# Altium PCB updated_pcb_file.PcbDoc (part 1 of 2)
Units mm, origin at the board's own origin, x right, y up, seen from the top; angles counter-clockwise.
Board outline 21 x 53.37 mm, 4 copper layers (Top Layer, Int1 (GND), Int2 (PWR), Bottom Layer), stack 1.334 mm thick; 52 components, 61 nets, 361 pads, 86 vias.
Unrouted connection lines stored in the file: 10.
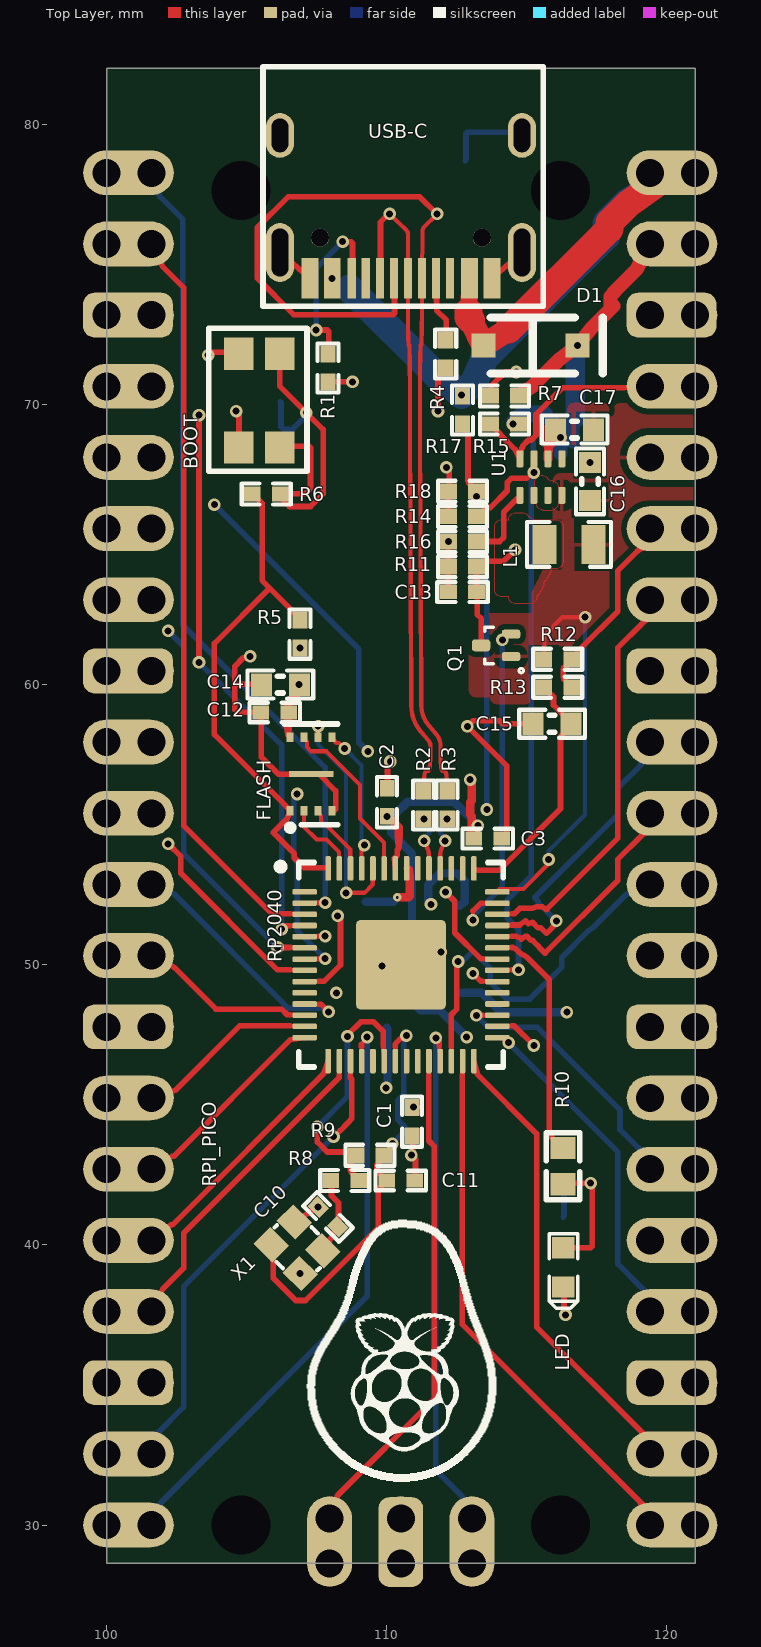
[diagram p0: Top Layer view]
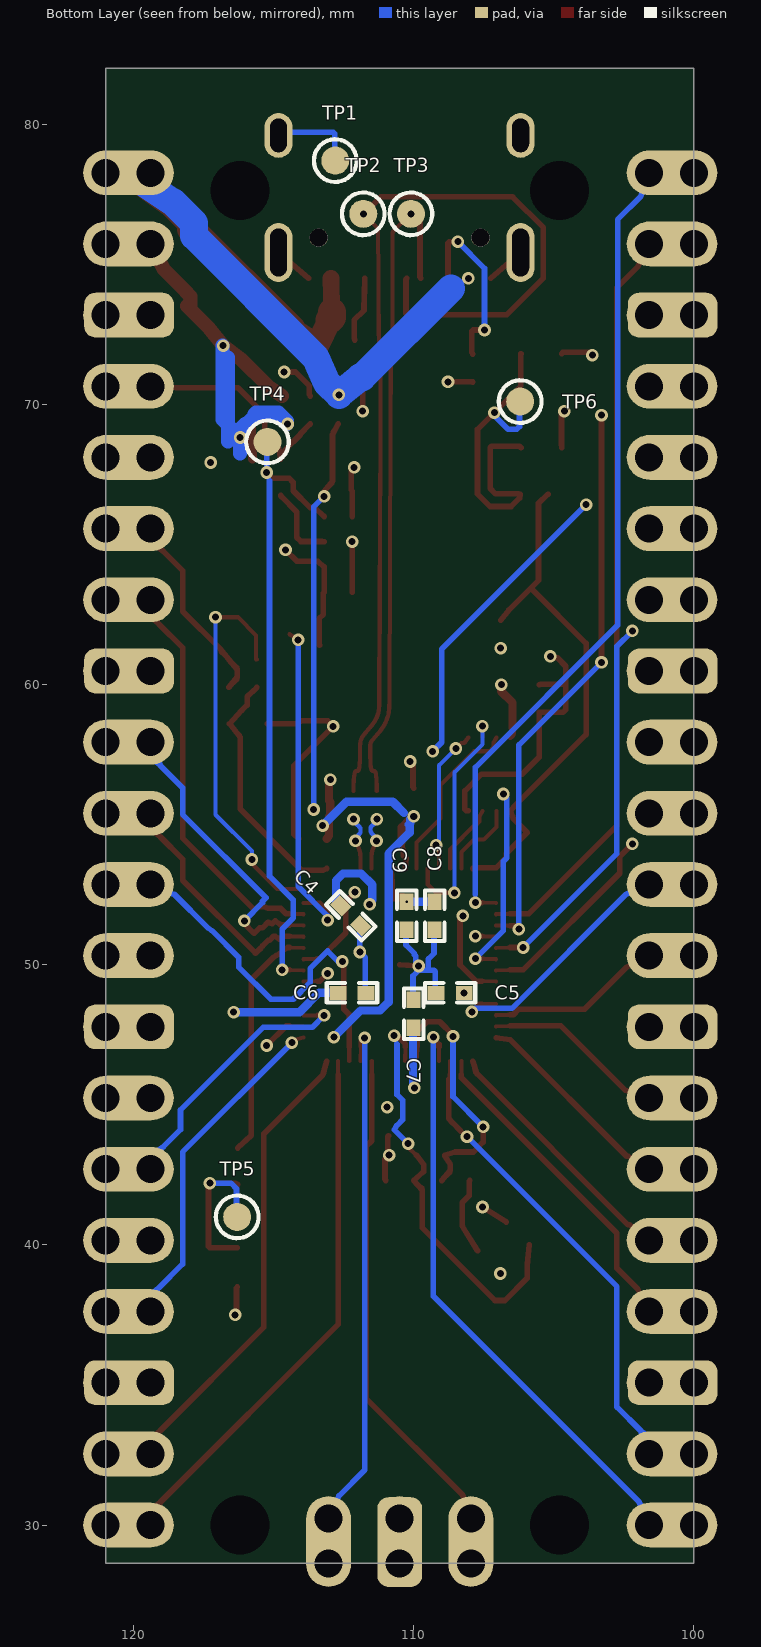
[diagram p1: Bottom Layer view, seen from below]
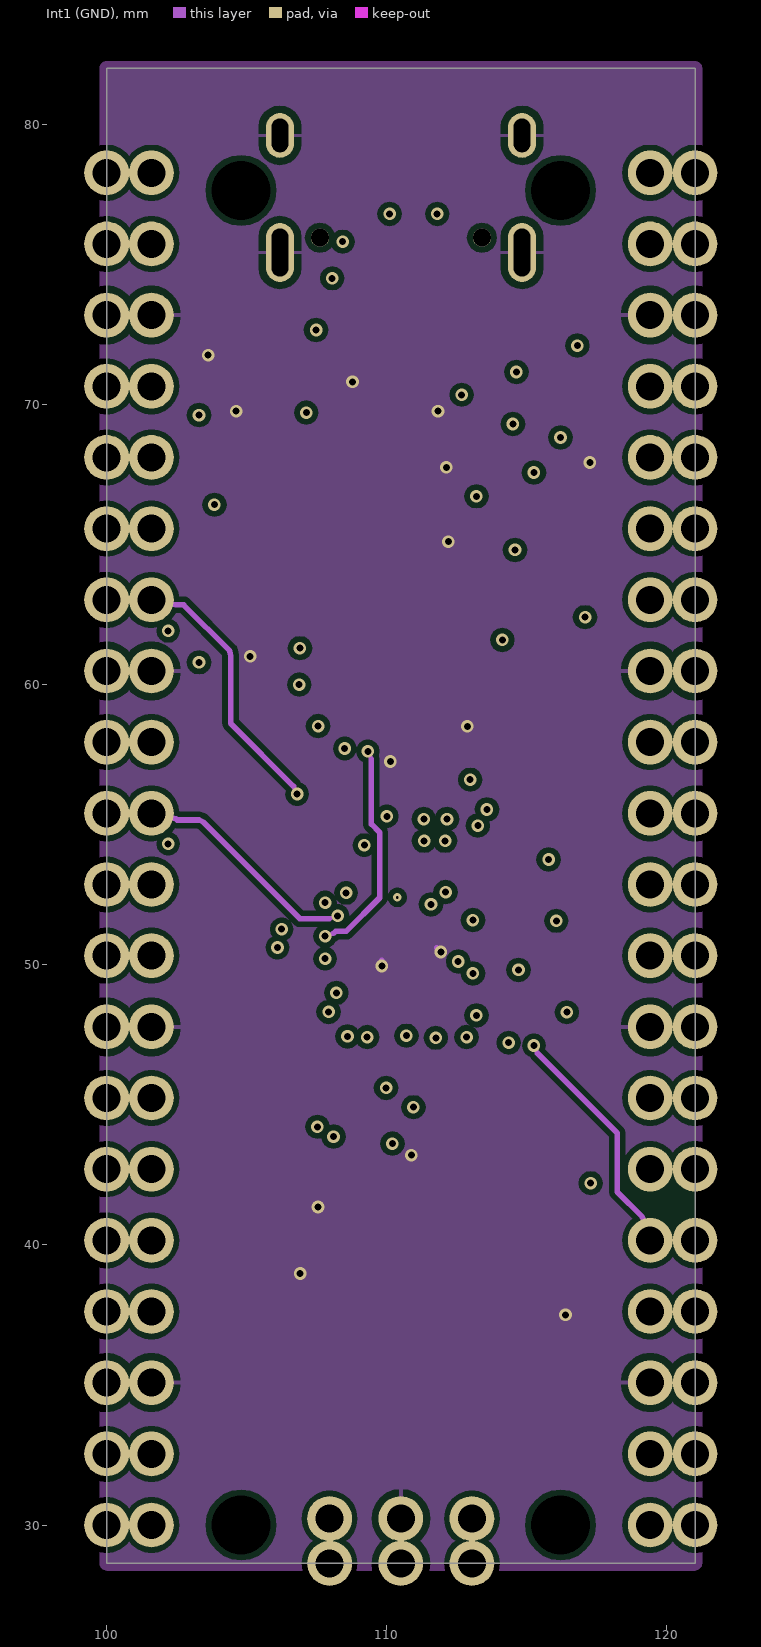
[diagram p2: Int1 (GND)]
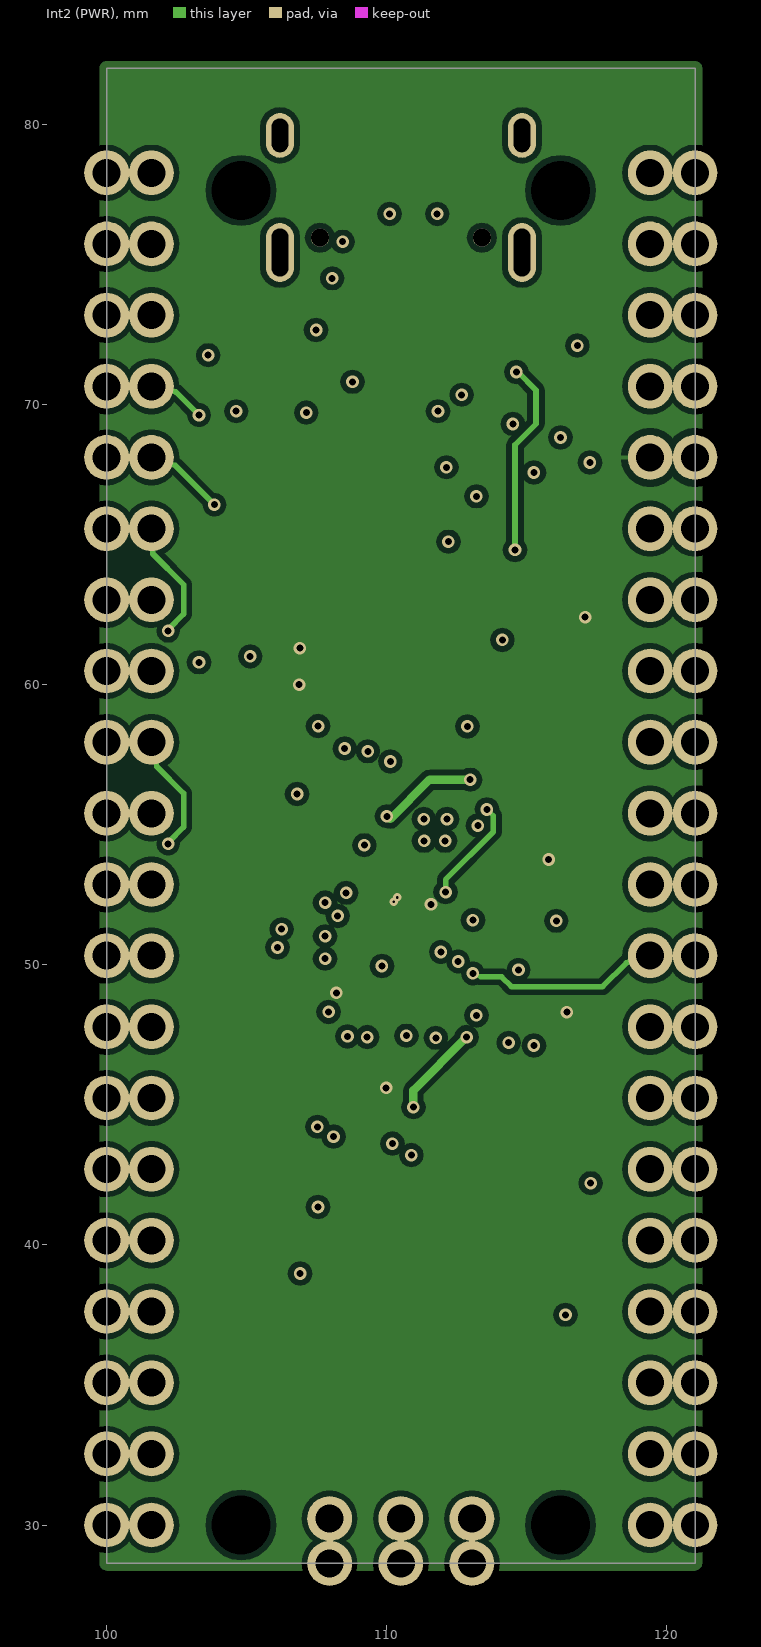
[diagram p3: Int2 (PWR)]
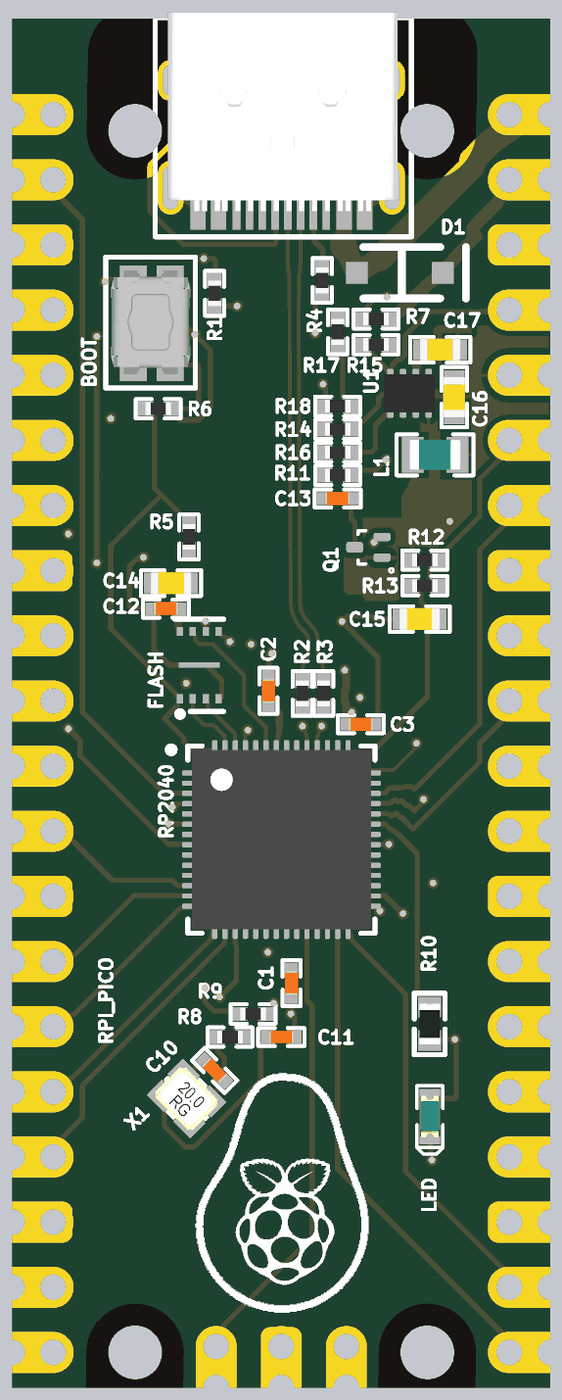
[diagram p5: 3D render of the assembled board from above, using the file's embedded part models]
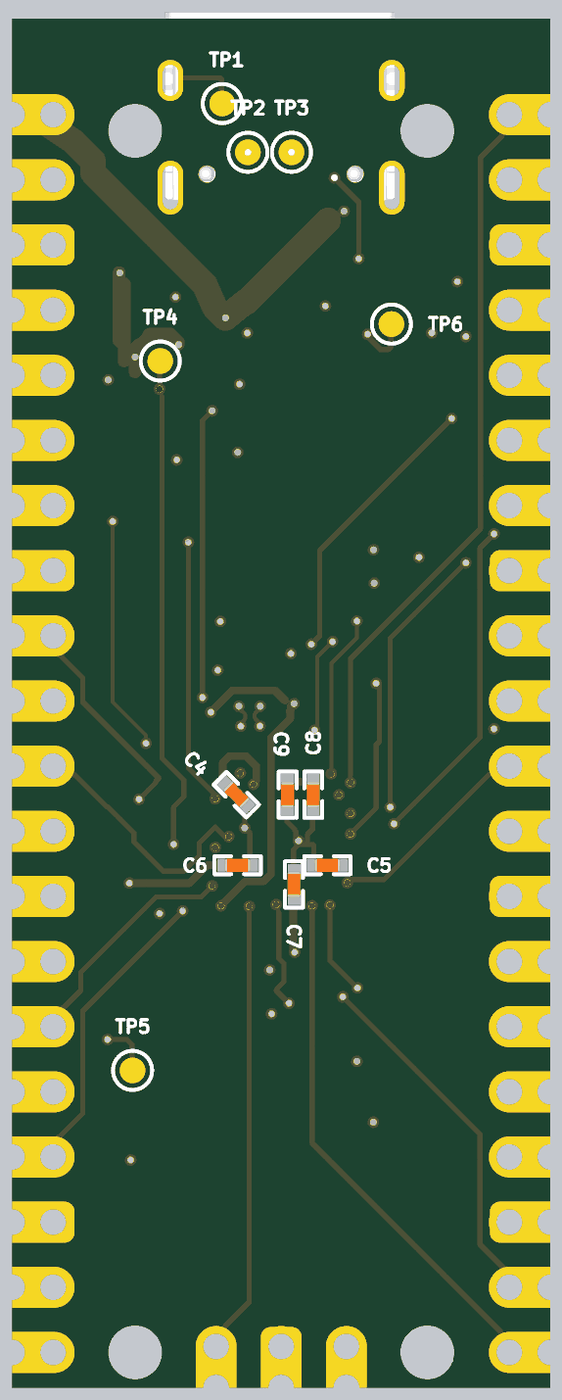
[diagram p6: 3D render of the assembled board from below, using the file's embedded part models]

## Layer stack, top to bottom
Top Solder: solder mask 0.0254, SM-001, Dk 4
Top Layer: signal copper 0.035
Dielectric 1: prepreg 0.1295, PP-017, Dk 4.3
Dielectric 2: prepreg 0.1295, PP-017, Dk 4.3
Int1 (GND): signal copper 0.0175
Dielectric 3: core 0.7112, Core-039, Dk 4.8
Int2 (PWR): signal copper 0.0175
Dielectric 4: prepreg 0.1295, PP-017, Dk 4.3
Dielectric 5: prepreg 0.1295, PP-017, Dk 4.3
Bottom Layer: signal copper 0.035
Bottom Solder: solder mask 0.0254, SM-001, Dk 4

## Board outline
100,28.63 100,82 121,82 121,28.63

## Design rules (kind name [scope] priority, off if disabled: settings)
Clearance Clearance_3 [InComponent('U1')] p1: gap=0.127 ignorepadtopadclearanceinfootprint=TRUE
Clearance Clearance_2 [InNet('VIN')] p2 off: gap=0.8 ignorepadtopadclearanceinfootprint=TRUE
Clearance Clearance_1 [All] p3: gap=0.2 ignorepadtopadclearanceinfootprint=TRUE
Clearance [All] p4 off: gap=0.2 ignorepadtopadclearanceinfootprint=TRUE
ComponentClearance [All] p1 off: gap=0.254 collisioncheckmode=3 verticalgap=0.254 showdistances=FALSE
DiffPairsRouting [InDifferentialPair('DiffPair')] p1: maxlimit=0.254 minlimit=0.089 mostfreqgap=0.2 toplayer_minwidth=0.089 toplayer_maxwidth=0.381 toplayer_prefwidth=0.15 midlayer1_minwidth=0.089 midlayer1_maxwidth=0.381 midlayer1_prefwidth=0.15 midlayer2_minwidth=0.089 midlayer2_maxwidth=0.381 midlayer2_prefwidth=0.15 bottomlayer_minwidth=0.089 bottomlayer_maxwidth=0.381 bottomlayer_prefwidth=0.15 maxuncoupledlength=12.7
HoleSize [All] p1: absolutevalues=TRUE maxlimit=6 minlimit=0.25 maxpercent=80.000 minpercent=20.000
HoleToHoleClearance [All] p1: gap=0.2 allowstackedmicrovias=TRUE
MatchedLengths usb [All] p1 off: tolerance=1 checknetsindiffpair=FALSE checkdiffpairvsdiffpair=TRUE checkxsignals=TRUE checkothers=TRUE
MinimumSolderMaskSliver [All] p1 off: minsoldermaskwidth=0.254
PlaneClearance [All] p1: clearance=0.254
PolygonConnect VIN [InNet('VIN')] p1: connectstyle=Direct reliefconductorwidth=0.254 reliefentries=4 polygonreliefangle="90 Angle" airgapwidth=0.254
PolygonConnect Connectors [HasFootprint('B06B-JWPF-SK-R')] p2: connectstyle=Direct reliefconductorwidth=0.254 reliefentries=4 polygonreliefangle="90 Angle" airgapwidth=0.254
PolygonConnect Connectors_1 [HasFootprint('B08B-JWPF-SK-R')] p3: connectstyle=Direct reliefconductorwidth=0.254 reliefentries=4 polygonreliefangle="90 Angle" airgapwidth=0.254
PolygonConnect Default [All] p4 off: connectstyle=Relief reliefconductorwidth=0.127 reliefentries=2 polygonreliefangle="90 Angle" airgapwidth=0.254
PolygonConnect vbus [InNet('NetQ1_1')] p5: connectstyle=Direct reliefconductorwidth=0.254 reliefentries=4 polygonreliefangle="90 Angle" airgapwidth=0.254
PolygonConnect vbus_1 [InNet('NetC9_1')] p6: connectstyle=Direct reliefconductorwidth=0.254 reliefentries=4 polygonreliefangle="90 Angle" airgapwidth=0.254
PolygonConnect VIAS [IsVia] p7: connectstyle=Direct reliefconductorwidth=0 reliefentries=4 polygonreliefangle="90 Angle" airgapwidth=0
PolygonConnect PolygonConnect_1 [All] p8: connectstyle=Relief reliefconductorwidth=0.127 reliefentries=2 polygonreliefangle="90 Angle" airgapwidth=0.254
RoutingVias [All] p1: holewidth=0.3 width=0.5 viastyle="Through Hole" minholewidth=0.1 minwidth=0.3 maxholewidth=0.25 maxwidth=0.45
SilkToSilkClearance [All] p1 off: silktosilkclearance=0.15
SilkToSolderMaskClearance [IsPad] p1 off: minsilkscreentomaskgap=0.254 clearancetoexposedcopper=TRUE
SolderMaskExpansion SolderMaskExpansion_1 [IsVia] p1: expansion=0.102 istentingtop=TRUE
SolderMaskExpansion [All] p2: expansion=0 istentingtop=FALSE
Width [All] p1: maxlimit=1 minlimit=0.127 preferedwidth=0.2
22 further rules are at their usual default settings.

## Classes and differential pairs
differential pair P: +P_P -P_N

## Components (designator, comment, footprint, x,y, rotation, side; value= is the part's Value field where it differs from the comment)
BOOT "EVP-AA002K" MiniSwitch 106.173,68.454 r90 top
C1 "100nF" C0402 110.901,44.396 r90 top value=100pF
C2 "100nF" C0402 110.001,55.796 r270 top value=100pF
C3 "1uF" C0402 113.601,54.496 r180 top value=100pF
C4 "1uF" C0402 112.251,51.746 r45 bottom value=100pF
C5 "100nF" C0402 108.701,48.996 r180 bottom value=100pF
C6 "100nF" C0402 112.201,48.996 r0 bottom value=100pF
C7 "100nF" C0402 110.001,48.246 r270 bottom value=100pF
C8 "100nF" C0402 109.251,51.746 r90 bottom value=100pF
C9 "100nF" C0402 110.251,51.746 r90 bottom value=100pF
C10 "15pF" C0402 107.901,40.996 r135 top value=100pF
C11 "15pF" C0402 110.501,42.296 r0 top value=100pF
C12 "100nF" C0402 106.001,58.996 r0 top value=100pF
C13 "1nF" C0402 112.701,63.296 r0 top value=100pF
C14 "2.2uF" C0603 106.201,59.996 r0 top value=100pF
C15 "2.2uF" C0603 115.901,58.596 r0 top value=100pF
C16 "10uF" C0603 117.251,67.246 r270 top value=100pF
C17 "4.7uF" C0603 116.701,69.096 r180 top value=100pF
D1 "mbr120vlsft1g" SOD-123 113.454,72.096 r0 top locked
FLASH "GD25Q16CEIGR" GD25Q16CEIGR 106.551,55.49 r90 top
L1 "2.2uH" IND0805 116.501,64.996 r0 top value=120R/0.55A
LED "L0603G" LED_0603 116.301,39.193 r90 top
Q1 "dmg1012T" SOTFL3P40_120X120X55L30X32N 113.899,61.394 r180 top
R1 "5.1K" RES0402 107.901,71.296 r90 top value=0R
R2 "27.4R" RES0402 111.321,55.696 r90 top value=0R
R3 "27.4R" RES0402 112.151,55.696 r90 top value=0R
R4 "5.1K" RES0402 112.101,71.796 r270 top value=0R
R5 "DNP" RES0402 106.901,61.796 r270 top value=0R
R6 "1K" RES0402 105.701,66.796 r180 top value=0R
R7 "200K" RES0402 114.201,70.296 r0 top value=0R
R8 "1K" RES0402 108.501,42.296 r0 top value=0R
R9 "DNP" RES0402 109.401,43.196 r180 top value=0R
R10 "470R" RES0603R 116.291,42.806 r270 top value=0R
R11 "100K" RES0402 112.701,64.196 r0 top value=0R
R12 "200R" RES0402 116.101,60.896 r180 top value=0R
R13 "1R" RES0402 116.101,59.896 r180 top value=0R
R14 "100K" RES0402 112.701,65.996 r180 top value=0R
R15 "100K" RES0402 114.201,69.296 r0 top value=0R
R16 "267K" RES0402 112.701,65.096 r0 top value=0R
R17 "5.1K" RES0402 112.701,69.796 r90 top value=0R
R18 "5.1K" RES0402 112.701,66.896 r0 top value=0R
RP2040 "RP2040" RP2040 110.506,49.996 r0 top locked
RPI_PICO "DNP" "RPI PICO" 100,30.001 r0 top locked
TP1 "DNP" TP_SMD_1.0mm 112.801,78.696 r180 bottom
TP2 "DNP" TP_SMD_1.0mm 111.801,76.796 r90 bottom
TP3 "DNP" TP_SMD_1.0mm 110.101,76.796 r90 bottom
TP4 "DNP" TP_SMD_1.0mm 115.221,68.656 r0 bottom
TP5 "DNP" TP_SMD_1.0mm 116.301,40.996 r90 bottom
TP6 "DNP" TP_SMD_1.0mm 106.201,70.096 r90 bottom
U1 "TPS62840DLCR" TPS62840 115.501,67.398 r270 top
USB-C "TYPE-C-31-M-12" TYPE-C-31-M-12 113.756,74.501 r180 top locked
X1 "12MHz" XTAL_2016 106.801,39.896 r315 top value=32MHz

## Footprints (in the part's own frame and the unit in brackets; to place one, negate y for a bottom-side part, rotate by r counter-clockwise, add the part's x,y. Pads: shape width x height; smd on the part's side, far side on the other; paste and mask are expansions set on the pad)
C0402 [mm]
  rect 0.6x0.5 smd: 1(-0.5,0) 2(0.5,0)
  silkscreen extent -0.9,-0.35 0.9,0.35, body extent -0.51,-0.25 0.51,0.25, height 0.5
C0603 [mm]
  rect 0.75x0.8 smd: 1(-0.675,0) 2(0.675,0)
  silkscreen extent -1.17,-0.5 1.17,0.5, body extent -0.8,-0.44 0.8,0.43, height 0.8
GD25Q16CEIGR [mm] "Flash SPI USON8 Package"
  rect 0.35x0.25 smd: 1(0,0) 2(0,-0.5) 3(0,-1) 4(0,-1.5) 5(2.625,-1.5) 6(2.625,-1) 7(2.625,-0.5) 8(2.625,0)
  rect 0.2x1.6 smd: 4(1.312,-0.75)
  silkscreen extent -0.7,-1.7 3.1,0.2, body extent -0.18,-1.74 2.82,0.26, height 0.45
IND0805 [mm] "Inductor 0805 reflow soldering"
  rect 0.85x1.4 smd: 1(-0.875,0) 2(0.875,0)
  silkscreen extent -1.5,-0.8 1.5,0.8, body extent -1,-0.59 1,0.6, height 0.99
LED_0603 [mil]
  rect 30x32 smd: 1(-27.5,0) 2(27.5,0)
  silkscreen extent -58,-20 48,20, body extent -32,-16 32,16, height 24
MiniSwitch [mm]
  rect 1.15x1.05 smd: 1(0,1.45) 1(3.35,1.45) 2(0,0) 2(3.35,0)
  silkscreen extent -0.85,-0.98 4.25,2.52, body extent -0.43,-0.78 3.87,2.33, height 1.7
RES0402 [mm]
  rect 0.6x0.55 smd: 1(-0.5,0) 2(0.5,0)
  silkscreen extent -0.87,-0.38 0.88,0.38, body extent -0.5,-0.25 0.5,0.25, height 0.3
RES0603R [mm] "resistor 0603 reflow soldering"
  rect 0.8x0.9 smd: 1(-0.65,0) 2(0.65,0)
  silkscreen extent -1.2,-0.6 1.2,0.6, body extent -0.8,-0.4 0.8,0.4, height 0.45
RP2040 [mm]
  rrect50% 0.875x0.2 smd: 1(-3.437,2.6) 2(-3.437,2.2) 3(-3.437,1.8) 4(-3.437,1.4) 5(-3.437,1) 6(-3.437,0.6) 7(-3.437,0.2) 8(-3.437,-0.2) 9(-3.437,-0.6) 10(-3.437,-1) 11(-3.437,-1.4) 12(-3.437,-1.8) 13(-3.437,-2.2) 14(-3.437,-2.6) 29(3.437,-2.6) 30(3.437,-2.2) 31(3.437,-1.8) 32(3.437,-1.4) 33(3.437,-1) 34(3.437,-0.6) 35(3.437,-0.2) 36(3.437,0.2) 37(3.437,0.6) 38(3.437,1) 39(3.437,1.4) 40(3.437,1.8) 41(3.437,2.2) 42(3.437,2.6)
  rrect50% 0.2x0.875 smd: 15(-2.6,-3.437) 16(-2.2,-3.437) 17(-1.8,-3.437) 18(-1.4,-3.437) 19(-1,-3.437) 20(-0.6,-3.437) 21(-0.2,-3.437) 22(0.2,-3.437) 23(0.6,-3.437) 24(1,-3.437) 25(1.4,-3.437) 26(1.8,-3.437) 27(2.2,-3.437) 28(2.6,-3.437) 43(2.6,3.437) 44(2.2,3.437) 45(1.8,3.437) 46(1.4,3.437) 47(1,3.437) 48(0.6,3.437) 49(0.2,3.437) 50(-0.2,3.437) 51(-0.6,3.437) 52(-1,3.437) 53(-1.4,3.437) 54(-1.8,3.437) 55(-2.2,3.437) 56(-2.6,3.437)
  rrect10% 3.2x3.2 smd: 57(0,0)
  silkscreen extent -4.42,-3.65 3.65,3.65, body extent -3.5,-3.5 3.5,3.5, height 0.9
"RPI PICO" [mm] "PICO"
  round 1.6 hole 1: 1(0,48.26) 1(1.6,48.26) 2(0,45.72) 2(1.6,45.72) 3(0,43.18) 3(1.6,43.18) 4(0,40.64) 4(1.6,40.64) 5(0,38.1) 5(1.6,38.1) 6(0,35.56) 6(1.6,35.56) 7(0,33.02) 7(1.6,33.02) 8(0,30.48) 8(1.6,30.48) 9(0,27.94) 9(1.6,27.94) 10(0,25.4) 10(1.6,25.4) 11(0,22.86) 11(1.6,22.86) 12(0,20.32) 12(1.6,20.32) 13(0,17.78) 13(1.6,17.78) 14(0,15.24) 14(1.6,15.24) 15(0,12.7) 15(1.6,12.7) 16(0,10.16) 16(1.6,10.16) 17(0,7.62) 17(1.6,7.62) 18(0,5.08) 18(1.6,5.08) 19(0,2.54) 19(1.6,2.54) 20(0,0) 20(1.6,0) 21(19.4,0) 21(21,0) 22(19.4,2.54) 22(21,2.54) 23(19.4,5.08) 23(21,5.08) 24(19.4,7.62) 24(21,7.62) 25(19.4,10.16) 25(21,10.16) 26(19.4,12.7) 26(21,12.7) 27(19.4,15.24) 27(21,15.24) 28(19.4,17.78) 28(21,17.78) 29(19.4,20.32) 29(21,20.32) 30(19.4,22.86) 30(21,22.86) 31(19.4,25.4) 31(21,25.4) 32(19.4,27.94) 32(21,27.94) 33(19.4,30.48) 33(21,30.48) 34(19.4,33.02) 34(21,33.02) 35(19.4,35.56) 35(21,35.56) 36(19.4,38.1) 36(21,38.1) 37(19.4,40.64) 37(21,40.64) 38(19.4,43.18) 38(21,43.18) 39(19.4,45.72) 39(21,45.72) 40(19.4,48.26) 40(21,48.26) 41(7.96,-1.37) 41(7.96,0.23) 42(10.5,-1.37) 42(10.5,0.23) 43(13.04,-1.37) 43(13.04,0.23)
  oval 3.2x1.6 smd paste-1: 1(0.762,48.26) 2(0.762,45.72) 4(0.762,40.64) 5(0.762,38.1) 6(0.762,35.56) 7(0.762,33.02) 9(0.762,27.94) 10(0.762,25.4) 11(0.762,22.86) 12(0.762,20.32) 14(0.762,15.24) 15(0.762,12.7) 16(0.762,10.16) 17(0.762,7.62) 19(0.762,2.54) 20(0.762,0) 21(20.162,0) 22(20.162,2.54) 24(20.162,7.62) 25(20.162,10.16) 26(20.162,12.7) 27(20.162,15.24) 29(20.162,20.32) 30(20.162,22.86) 31(20.162,25.4) 32(20.162,27.94) 34(20.162,33.02) 35(20.162,35.56) 36(20.162,38.1) 37(20.162,40.64) 39(20.162,45.72) 40(20.162,48.26)
  oval 3.2x1.6 smd far side paste-1: 1(0.762,48.26) 2(0.762,45.72) 4(0.762,40.64) 5(0.762,38.1) 6(0.762,35.56) 7(0.762,33.02) 9(0.762,27.94) 10(0.762,25.4) 11(0.762,22.86) 12(0.762,20.32) 14(0.762,15.24) 15(0.762,12.7) 16(0.762,10.16) 17(0.762,7.62) 19(0.762,2.54) 20(0.762,0) 21(20.162,0) 22(20.162,2.54) 24(20.162,7.62) 25(20.162,10.16) 26(20.162,12.7) 27(20.162,15.24) 29(20.162,20.32) 30(20.162,22.86) 31(20.162,25.4) 32(20.162,27.94) 34(20.162,33.02) 35(20.162,35.56) 36(20.162,38.1) 37(20.162,40.64) 39(20.162,45.72) 40(20.162,48.26)
  rrect50% 3.2x1.6 smd paste-1: 3(0.762,43.18) 8(0.762,30.48) 13(0.762,17.78) 18(0.762,5.08) 23(20.162,5.08) 28(20.162,17.78) 33(20.162,30.48) 38(20.162,43.18)
  rrect50% 3.2x1.6 smd far side paste-1: 3(0.762,43.18) 8(0.762,30.48) 13(0.762,17.78) 18(0.762,5.08) 23(20.162,5.08) 28(20.162,17.78) 33(20.162,30.48) 38(20.162,43.18)
  oval 1.6x3.2 smd paste-1: 41(7.96,-0.608) 43(13.04,-0.608)
  oval 1.6x3.2 smd far side paste-1: 41(7.96,-0.608) 43(13.04,-0.608)
  rrect50% 1.6x3.2 smd paste-1: 42(10.5,-0.608)
  rrect50% 1.6x3.2 smd far side paste-1: 42(10.5,-0.608)
  round 1 hole 2.1 unplated: 44(4.8,0) 44(4.8,47.63) 44(16.2,0) 44(16.2,47.63)
SOD-123 [mm] "Diode"
  rect 0.85x0.85 smd: 1(0,0) 2(3.35,0)
  silkscreen extent 0.25,-1 4.25,1, body extent 0.25,-0.75 3.25,0.75, height 1.35
SOTFL3P40_120X120X55L30X32N [mm]
  rrect54% 0.66x0.32 smd: 1(-0.535,0.4) 2(-0.535,-0.4)
  rrect54% 0.66x0.42 smd: 3(0.535,0)
  silkscreen extent -0.98,-0.65 0.4,0.98, body extent -0.5,-0.7 0.4,0.6, height 0.6
TP_SMD_1.0mm [mm]
  round 1 smd paste-5: 1(0,0)
  silkscreen extent -0.76,-0.76 0.76,0.76
TPS62840 [mm]
  rrect40% 0.6x0.25 smd: 1(-0.65,0.75) 2(-0.65,0.25) 3(-0.65,-0.25) 4(-0.65,-0.75) 5(0.65,-0.75) 6(0.65,-0.25) 7(0.65,0.25) 8(0.65,0.75)
  body extent -0.75,-1 0.75,1, height 1
TYPE-C-31-M-12 [mm]
  rect 0.6x1.45 smd: 1(0,0) 1(6.5,0) 2(0.8,0) 2(5.7,0)
  rect 0.3x1.45 smd: 3(1.5,0) 4(2,0) 5(2.5,0) 6(3,0) 7(3.5,0) 8(4,0) 9(4.5,0) 10(5,0)
  oval 1x2.1 hole 1.7 slot 0.6 at 0 deg: 11(-1.07,-0.915) 11(7.57,-0.915)
  oval 1x1.6 hole 1.2 slot 0.6 at 0 deg: 11(-1.07,-5.095) 11(7.57,-5.095)
  round 0.65 hole 0.65: 12(0.36,-1.445) 12(6.14,-1.445)
  silkscreen extent -1.83,-7.55 8.18,1, body extent -1.27,-7.75 7.68,0, height 3.27
XTAL_2016 [mm]
  rect 0.95x0.85 smd: 1(-0.725,-0.575) 2(0.725,-0.575) 3(0.725,0.575) 4(-0.725,0.575)
  silkscreen extent -1.08,-0.88 1.08,0.88, body extent -1.05,-0.85 1.05,0.85, height 0.56

## Part data
BOOT: library part SwitchMini, "EVPAA002K = 1.0 N, EVPAAU02Q = 7.0 N", Supplier Part Number 1=P13347SCT-ND, Supplier 1=Digi-Key
C1 C2 C3 C4 C5 C6 C7 C8 C9 C10 C11 C12 C13 C14 C15 C16 C17: library part CAP, "Capacitor", Published=8-Jun-2000, Publisher="Altium Limited", Revision="July-2002: Re-released for DXP Platform."
D1: library part Diode, "Switch-mode Schottky / Power Rectifier / 250 V, 40 A"
FLASH: library part "Flash SPI", "Flash SPI 16Mb = 2 MB", Supplier Part Number 1=363-GD25Q16CEIGR, Supplier 1=Mouser
L1: "Inductor", Manufacturer=Murata, Manufacturer Part Number=BLM15AG121SN1D, Part Number=FB0402-120R@100M-500mA, Part number IPS=N.A., Artikkelnr Noca=33029317, ComponentLink1Description=Datasheet, ComponentLink2Description="Supplier link", Footprint Doc=0402, HelpURL=http://search.murata.co.jp/Ceramy/image/img/PDF/ENG/L0110S0100BLM15A_SN.pdf, LatestRevisionDate=2014-01-10, Note="Chip EMIFIL Inductor Type Chip Ferrite Bead", Pin Count=2, Published=2011-11-14, Publisher="Nordic Semiconductor"
LED: "LED, Green, 0603, 570nm, Vf=1.7V, 2.24..5.6mcd, - 40 to +100Â°C", Manufacturer=Osram, Manufacturer Part Number="LG L29K-G2J1-24-Z", Part Number="LG L29K Smartled Green", Part number IPS=N.A., Supplier Part Number 1=475-2709-1-ND, Artikkelnr Noca=13019147, ComponentLink1Description=Datasheet, ComponentLink2Description="Supplier link", Footprint Doc=0603, HelpURL=http://www.osram-os.com/Graphics/XPic2/00077107_0.pdf, LatestRevisionDate=2017-08-21, Note="2.24..5.6 mcd, Vfmin=1.7V", Pin Count=2, Published=2014-10-28, Publisher="Nordic Semiconductor", Supplier 1=Digi-Key, Supplier 2=Mouser, Supplier Part Number 2=720-LGL29KG2J124Z
Q1: library part Transistor, "N-Channel 20V 100mA _Ta_ 150mW _Ta_ Surface Mount VMT3", Package="SOT-723 Rohm", Digi-Key_Part_Number=RUM001L02T2CLCT-ND, Digi-Key_Purchase_URL=https://www.digikey.com/product-detail/en/rohm-semiconductor/RUM001L02T2CL/RUM001L02T2CLCT-ND/4571412?utm_source=snapeda&utm_medium=aggregator&utm_campaign=symbol, MF=Rohm, MP=RUM001L02T2CL, SnapEDA_Link=https://www.snapeda.com/parts/RUM001L02T2CL/Rohm/view-part/531428/?ref=snap
R1 R2 R3 R4 R5 R6 R7 R8 R9 R10 R11 R12 R13 R14 R15 R16 R17 R18: "Resistor, Â±5%, 0.05W", Part Number=R0201-0R, Part number IPS=00000003245, Artikkelnr Noca=N.A., ComponentLink1Description=Datasheet, ComponentLink2Description="Supplier link", Footprint Doc=0201, LatestRevisionDate=2017-11-09, Note="Chip Res 5%", Pin Count=2, Published=2014-11-13, Publisher="Nordic Semiconductor"
RP2040: "RP2040 First MCU from RPI"
RPI_PICO: library part RPI_PICO, "RPI_PICO"
TP1 TP2 TP3 TP4 TP5 TP6: library part TP
U1: library part TPS62840, "Ultra low IQ Step Down Converter, DLC0008A (VSON-HR-8)", Alternate Manufacturer="Texas Instruments", Operating Temperature Range="-40 to 125 C", Supplier Part Number 1=595-TPS62840DLCR, AEC Category=Q200, AEC Qualified=N, ComponentLink1Description="Datasheet Link", ComponentLink1URL=http://www.ti.com/lit/ds/symlink/tps62840.pdf, ComponentLink2Description="Product Folder", ComponentLink2URL=http://www.ti.com/product/tps62840, ComponentLink3Description="Online Datasheet", ComponentLink3URL=http://www.ti.com/product/tps62840/datasheet, CompType=IC, Manufacturer="Texas Instruments", MountType=SMT, PackageDescription=VSON-HR-8, PackageReference=DLC0008A, PartNumber=TPS62840DLCR, SizeArea_mm2=3, SizeAreaWB_mm2=7.5, SizeX_mm=1.5, SizeY_mm=2, SizeZ_mm=1, Supplier 1=Mouser
USB-C: library part USB-C, "USB C connector", ComponentLink1Description=LCSC, ComponentLink1URL=https://lcsc.com/product-detail/USB-Connectors_Korean-Hroparts-Elec-TYPE-C-31-M-12_C165948.html
X1: "XTAL SMD 2016, 32MHz, Cl=8pF, Total Tol: Â±40ppm", Part Number=XTAL_SMD2016_32MHz_8pF_General, Footprint Doc=XTAL_2016, LatestRevisionDate=2016-08-19, Pin Count=4, Published=2016-08-19, Publisher="Nordic Semiconductor"

## Via types
v1: diameter 0.45, hole 0.25, Top Layer to Bottom Layer, tented both sides, 84 vias
v2: diameter 0.3, hole 0.1, Int2 (PWR) to Bottom Layer, tented both sides, 1 vias
v3: diameter 0.3, hole 0.1, Top Layer to Int2 (PWR), tented both sides, 1 vias

## Nets (pads, with @x,y where several pads share a name; then routed paths per layer and width w, separated by ;. In a path a pad name is that pad's centre, name@x,y a point inside that pad or via, vN(x,y) a via of type N, cw(c..) or ccw(c..) an arc to the next point about the centre after c; other vN are vias at no path point)
1V1: C1.2 C2.2 C3.2 RP2040.23 RP2040.45 RP2040.50 | length 23.7
  Top Layer w0.2: RP2040.50@110.305,53.432 110.276,53.801 110.376,53.901 110.376,54.101 110.426,54.151
  Top Layer w0.212: 110.426,54.151 110.426,54.201
  Top Layer w0.222: 110.426,54.201 110.426,54.251
  Top Layer w0.232: 110.426,54.251 110.426,54.301
  Top Layer w0.242: 110.426,54.301 110.426,54.351
  Top Layer w0.252: 110.426,54.351 110.426,54.401
  Top Layer w0.262: 110.426,54.401 110.426,54.451
  Top Layer w0.272: 110.426,54.451 110.426,54.501
  Top Layer w0.282: 110.426,54.501 110.426,54.551
  Top Layer w0.292: 110.426,54.551 110.426,54.601
  Top Layer w0.3: v1(110,55.295) 110.126,55.201 110.426,54.901 110.426,54.601 ; v1(112.976,56.601) 113.026,56.551 113.026,55.851 112.976,55.801 112.976,55.351 113.026,55.301 113.026,54.601 C3.2@113.101,54.496
  Int2 (PWR) w0.3: v1@110.126,55.201 111.526,56.601 v1(112.976,56.601) ; v1(110.949,44.914) 110.949,45.514 v1(112.849,47.414)
  Bottom Layer w0.3: v1@110.126,55.201 110.126,55.051 110.176,55.001 ; 110.149,54.964 110.149,54.714 110.899,53.964 110.899,48.664 111.199,48.364 111.899,48.364 v1(112.849,47.414) ; 110.349,55.414 110.749,55.814 112.399,55.814 v1(113.249,54.964)
3V3: C4.2 C5.2 C6.2 C7.2 C8.2 C9.2 C12.2 C14.2 C16.2 FLASH.8 L1.2 Q1.1 R5.2 R12.2 RP2040.1 RP2040.10 RP2040.22 RP2040.33 RP2040.42 RP2040.44 RP2040.48 RP2040.49 RPI_PICO.36 U1.8 | length 28.3
  Top Layer w0.15: RP2040.42@113.942,52.595 113.976,52.651 114.026,52.701 114.876,52.701 115.776,53.601 v1(115.776,53.751) ; R12.2@115.6,60.895 115.626,60.901 115.626,61.751 116.276,62.401 v1(117.076,62.401)
  Top Layer w0.2: FLASH.8@106.526,58.151 FLASH.8@106.55,58.113 ; RP2040.49@110.705,53.432 RP2040.49@110.776,53.451
  Top Layer w0.212: FLASH.8@106.476,58.201 FLASH.8@106.526,58.151 ; RP2040.49@110.776,53.451 110.826,53.401
  Top Layer w0.224: FLASH.8@106.476,58.201 FLASH.8@106.476,58.251 ; 110.826,53.351 110.826,53.401
  Top Layer w0.234: FLASH.8@106.476,58.251 106.476,58.301 ; 110.826,53.301 110.826,53.351
  Top Layer w0.244: 106.476,58.301 106.476,58.351 ; 110.826,53.251 110.826,53.301
  Top Layer w0.254: 106.476,58.351 106.476,58.401 ; 110.826,53.201 110.826,53.251
  Top Layer w0.264: 106.476,58.401 106.476,58.451 ; 110.826,53.151 110.826,53.201
  Top Layer w0.274: 106.476,58.451 106.476,58.501 ; 110.826,53.101 110.826,53.151
  Top Layer w0.284: 106.476,58.501 106.476,58.551 ; 110.826,53.051 110.826,53.101
  Top Layer w0.294: 106.476,58.551 106.476,58.601 ; 110.826,53.001 110.826,53.051
  Top Layer w0.3: 106.476,58.601 106.476,59.351 106.876,59.751 v1(106.875,59.995) ; v3(110.376,52.401) 110.776,52.401 110.826,52.451 110.826,53.001
  Bottom Layer w0.15: v1(115.776,53.751) 115.776,54.051 117.076,55.351 v1(117.076,62.401)
  Bottom Layer w0.3: C8.2@109.251,52.246 v2(110.25,52.245) ; v1(109.976,45.601) 110.026,45.651 110.026,47.701 C7.2@110,47.745 ; v1(111.576,52.151) 111.576,52.201 111.476,52.301 111.476,52.851 111.876,53.251 112.526,53.251 112.776,53.001 112.776,52.251 C4.2@112.604,52.099 ; C6.2@112.7,48.995 112.776,49.001 113.376,49.001 114.076,48.301 v1(116.426,48.301)
  other v1: 108.2,48.995 106.9,61.295
A0: RP2040.38 RPI_PICO.31 | length 11.7
  Top Layer w0.15: 119.049,54.564 119.084,54.648 ; RPI_PICO.31@119.4,55.395 119.084,54.648 ; RPI_PICO.31@120.162,55.395 119.084,54.648 ; RP2040.38@113.938,50.995 114.375,51.014 114.449,51.014 RP2040.38@113.938,50.995
  Top Layer w0.2: 114.449,51.014 114.599,51.014 114.749,50.964 114.799,50.914 114.949,51.014 114.999,51.014 115.149,50.864 115.199,50.864 115.399,50.664 115.462,50.586 115.571,50.477 115.649,50.414 118.249,53.014 118.249,53.764 119.049,54.564 RPI_PICO.31@120.162,55.395
A1: RP2040.39 RPI_PICO.32 | length 15.1
  Top Layer w0.15: v1@116.049,51.464 v1(116.049,51.564) ; RP2040.39@113.938,51.395 114.449,51.414 114.375,51.414 RP2040.39@113.938,51.395
  Top Layer w0.2: 114.449,51.414 114.749,51.414 114.799,51.464 114.949,51.564 115.049,51.464 115.199,51.514 115.399,51.314 115.499,51.314 115.699,51.114 v1@116.049,51.464
  Bottom Layer w0.15: 119.049,57.114 119.081,57.19 ; RPI_PICO.32@119.4,57.935 119.081,57.19 ; RPI_PICO.32@120.162,57.935 119.081,57.19
  Bottom Layer w0.2: v1(116.049,51.564) 115.399,52.214 115.399,52.264 115.274,52.389 118.249,55.364 118.249,56.314 119.049,57.114 ; RPI_PICO.32@119.4,57.935 119.049,57.114 ; RPI_PICO.32@120.162,57.935 119.049,57.114
A2: RP2040.40 RPI_PICO.34 | length 17.6
  Top Layer w0.15: 119.099,62.164 119.13,62.249 ; RPI_PICO.34@119.4,63.015 119.13,62.249 ; RPI_PICO.34@120.162,63.015 119.13,62.249 ; RP2040.40@113.938,51.795 114.449,51.814 114.375,51.814 RP2040.40@113.938,51.795
  Top Layer w0.2: 114.449,51.814 114.549,51.814 114.749,52.014 115.199,52.014 115.349,52.064 115.549,52.064 115.699,51.964 118.249,54.514 118.249,61.314 119.099,62.164 RPI_PICO.34@120.162,63.015
A3: Q1.2 RP2040.41 | length 13
  Top Layer w0.15: v1(113.074,51.589) 113.074,51.914 ; 113.424,52.189 113.938,52.195 113.5,52.189 113.424,52.189 ; v1(114.124,61.589) 114.435,61.795 114.158,61.642 v1(114.124,61.589)
  Top Layer w0.2: 113.074,51.914 113.349,52.189 113.424,52.189
  Bottom Layer w0.15: v1(113.074,51.589) v1@113.074,51.739
  Bottom Layer w0.2: v1@113.074,51.739 114.124,52.789 v1(114.124,61.589)
ENABLE: R15.1 RPI_PICO.37 U1.4 | length 12.6
  Top Layer w0.15: R15.1@113.7,69.295 114,69.02 114.049,68.939 ; 114.574,68.389 114.64,68.33 114.75,68.045 114.824,68.345 114.824,68.439 ; 118.474,70.589 RPI_PICO.37@118.566,70.589 ; RPI_PICO.37@119.4,70.635 RPI_PICO.37@118.566,70.589 ; RPI_PICO.37@120.162,70.635 RPI_PICO.37@118.566,70.589
  Top Layer w0.2: R15.1@113.7,69.295 114.049,68.939 114.049,68.914 114.574,68.389 114.75,68.045 114.824,68.439 114.849,68.464 114.849,68.514 115.049,68.714 115.149,68.714 115.324,68.889 115.324,69.639 116.274,70.589 118.474,70.589 RPI_PICO.37@120.162,70.635
GND: BOOT.1 C1.1 C2.1 C3.1 C4.1 C5.1 C6.1 C7.1 C8.1 C9.1 C10.2 C11.2 C12.1 C13.1 C14.1 C15.1 C16.1 C17.1 FLASH.4 LED.1 R1.1 R4.2 R11.1 R14.2 R16.1 R18.1 RP2040.19 RP2040.57 RPI_PICO.3 RPI_PICO.8 RPI_PICO.13 RPI_PICO.18 RPI_PICO.23 RPI_PICO.28 RPI_PICO.33 RPI_PICO.38 RPI_PICO.42 TP1.1 U1.1 USB-C.1 USB-C.11 X1.2 X1.4 | length 45.4
  Top Layer w0.2: v1(103.626,71.751) 103.626,71.801 103.676,71.851 104.676,71.851 BOOT.1@104.722,71.802 ; v1(104.626,69.751) 104.726,69.651 104.726,68.551 BOOT.1@104.722,68.452 ; v1(105.126,61.001) 105.076,60.951 104.876,60.951 104.576,60.651 104.576,60.001 ; C14.1@105.525,59.995 105.476,60.001 104.576,60.001 ; USB-C.11@106.185,75.415 USB-C.1@107.255,74.5 ; X1.4@106.694,40.814 v1(107.546,41.349) ; R1.1@107.9,70.795 107.976,70.801 v1(108.776,70.801) ; FLASH.4@108.05,55.488 108.126,55.501 108.176,55.551 108.176,56.201 107.576,56.801 107.3,56.801 106.126,56.801 105.526,57.401 105.526,59.001 105.5,58.995 105.476,59.001 104.676,59.001 104.576,59.101 104.576,60.001 ; v1(109.826,49.951) RP2040.57@110.505,49.995 ; C2.1@110,56.295 110.026,56.351 110.026,57.151 v1(110.126,57.251) ; C1.1@110.9,43.895 110.926,43.851 110.926,43.251 v1(110.876,43.201) 111.026,43.051 111.026,42.351 C11.2@111.001,42.296 ; v1(111.826,69.751) 111.826,71.001 R4.2@112.101,71.296 ; v1(112.126,67.751) 112.226,67.651 112.226,66.951 112.2,66.895 R14.2@112.2,65.995 ; v1(112.2,65.095) 112.2,64.195 C13.1@112.2,63.295 ; USB-C.1@113.755,74.5 USB-C.11@114.826,75.416 ; C3.1@114.1,54.495 114.276,54.651 114.276,57.101 v1(112.876,58.501) 113.076,58.701 114.026,58.701 114.126,58.601 C15.1@115.225,58.595 ; LED.1@116.3,38.493 116.326,38.451 116.326,37.551 v1(116.376,37.501)
  Int1 (GND) w0.2: v1(109.826,49.951) v1@109.826,50.151 ; v1@111.776,50.601 v1(111.926,50.451)
  Bottom Layer w0.2: C5.1@109.2,48.995 109.226,49.051 109.226,49.751 109.276,49.801 109.476,49.801 ; C8.1@109.25,51.245 109.276,51.201 109.276,50.401 109.476,50.201 109.476,49.801 ; C7.1@110.001,48.746 110.026,48.801 110.026,49.601 v1@109.826,49.801 ; C9.1@110.25,51.245 110.276,51.201 110.276,50.701 109.976,50.401 109.976,50.351 109.926,50.301 109.926,50.051 v1(109.826,49.951) v1@109.826,49.801 ; C6.1@111.7,48.995 111.726,49.051 111.726,50.251 v1(111.926,50.451) 111.926,51.351 C4.1@111.898,51.393 ; TP1.1@112.8,78.695 112.826,78.751 112.826,79.651 112.876,79.701 114.726,79.701 USB-C.11@114.826,79.596 ; 109.476,49.801 v1@109.826,49.801
  other v1: 106.906,38.976 117.25,67.92
GP0: RP2040.2 RPI_PICO.1 | length 32
  Top Layer w0.15: RP2040.2@107.063,52.195 107.574,52.214 107.5,52.214 RP2040.2@107.063,52.195
  Top Layer w0.2: v1@107.574,52.214 v1(107.799,52.214)
  Bottom Layer w0.15: RPI_PICO.1@100.762,78.255 101.869,77.501 ; RPI_PICO.1@101.6,78.255 101.869,77.501 ; 101.899,77.414 101.869,77.501 ; v1(107.799,52.214) 107.799,52.514
  Bottom Layer w0.2: RPI_PICO.1@101.6,78.255 101.899,77.414 102.724,76.589 102.724,62.114 107.799,57.039 107.799,52.514
GP1: RP2040.3 RPI_PICO.2 | length 29.6
  Top Layer w0.15: RPI_PICO.2@100.762,75.715 101.957,74.999 ; RPI_PICO.2@101.6,75.715 101.957,74.999 ; 101.999,74.914 101.957,74.999 ; 106.549,51.814 107.063,51.795 106.625,51.814 106.549,51.814
  Top Layer w0.2: RPI_PICO.2@101.6,75.715 101.999,74.914 102.749,74.164 102.749,54.964 105.899,51.814 106.549,51.814
GP2: RP2040.4 RPI_PICO.4 | length 23.9
  Top Layer w0.15: v1(106.249,51.264) v1@106.374,51.389 ; 106.549,51.389 106.625,51.389 107.063,51.395 106.549,51.389
  Top Layer w0.2: v1(103.299,60.789) v1(103.299,69.614) ; v1@106.374,51.389 106.549,51.389
  Int2 (PWR) w0.15: RPI_PICO.4@101.6,70.635 102.381,70.46 102.474,70.439
  Int2 (PWR) w0.2: RPI_PICO.4@101.6,70.635 102.474,70.439 v1(103.299,69.614)
  Bottom Layer w0.2: v1(103.299,60.789) 106.249,57.839 v1(106.249,51.264)
GP3: RP2040.5 RPI_PICO.5 | length 24
  Top Layer w0.15: RP2040.5@107.063,50.995 107.5,51.014 107.574,51.014 RP2040.5@107.063,50.995
  Top Layer w0.2: v1@107.574,51.014 v1(107.799,51.014)
  Int1 (GND) w0.15: v1(107.799,51.014) 108.099,51.114 ; v1(109.324,57.614) 109.449,57.339
  Int1 (GND) w0.2: 108.099,51.114 108.174,51.189 108.549,51.189 109.749,52.389 109.749,54.714 109.449,55.014 109.449,57.339
  Int2 (PWR) w0.15: RPI_PICO.5@101.6,68.095 102.36,67.844 102.449,67.814
  Int2 (PWR) w0.2: RPI_PICO.5@101.6,68.095 102.449,67.814 v1(103.849,66.414)
  Bottom Layer w0.2: v1(103.849,66.414) 108.999,61.264 108.999,57.939 v1(109.324,57.614)
GP4: RP2040.6 RPI_PICO.6 | length 19.6
  Top Layer w0.15: 106.549,50.614 107.063,50.595 106.625,50.614 106.549,50.614
  Top Layer w0.2: v1(106.099,50.614) 106.549,50.614
  Int2 (PWR) w0.15: RPI_PICO.6@101.6,65.555 101.643,64.756 101.649,64.664 ; v1(102.199,61.914) v1@102.199,61.964
  Int2 (PWR) w0.2: RPI_PICO.6@101.6,65.555 101.649,64.664 102.749,63.564 102.749,62.514 v1@102.199,61.964
  Bottom Layer w0.2: v1(102.199,61.914) 102.749,61.364 102.749,53.964 v1(106.099,50.614)
GP5: RP2040.7 RPI_PICO.7 | length 18.1
  Top Layer w0.15: RP2040.7@107.063,50.195 107.5,50.214 107.574,50.214 RP2040.7@107.063,50.195
  Top Layer w0.2: v1@107.574,50.214 v1(107.799,50.214)
  Int1 (GND) w0.15: RPI_PICO.7@101.6,63.015 102.384,62.858 102.474,62.839 ; 106.674,56.364 v1(106.799,56.089)
  Int1 (GND) w0.2: RPI_PICO.7@101.6,63.015 102.474,62.839 102.749,62.839 104.399,61.189 104.424,61.014 104.424,58.614 106.674,56.364
  Bottom Layer w0.15: v1@106.674,55.964 v1(106.799,56.089)
  Bottom Layer w0.2: v1@106.674,55.964 106.674,53.814 106.799,53.689 106.799,51.214 v1(107.799,50.214)
GP6: RP2040.8 RPI_PICO.9 | length 12.8
  Top Layer w0.15: 106.549,49.814 107.063,49.795 106.625,49.814 106.549,49.814
  Top Layer w0.2: v1(102.199,54.314) 102.649,53.864 102.649,53.264 106.099,49.814 106.549,49.814
  Int2 (PWR) w0.15: RPI_PICO.9@101.6,57.935 101.777,57.155 101.799,57.064 ; v1(102.199,54.314) v1@102.199,54.364
  Int2 (PWR) w0.2: RPI_PICO.9@101.6,57.935 101.799,57.064 102.749,56.114 102.749,54.914 v1@102.199,54.364
GP7: RP2040.9 RPI_PICO.10 | length 12.9
  Top Layer w0.15: v1(108.249,51.739) v1@108.349,51.639 ; RP2040.9@107.063,49.395 107.5,49.414 107.574,49.414 RP2040.9@107.063,49.395
  Top Layer w0.2: 107.574,49.414 107.774,49.414 108.349,49.989 v1@108.349,51.639
  Int1 (GND) w0.15: RPI_PICO.10@101.6,55.395 102.383,55.233 102.474,55.214 ; 107.949,51.639 v1(108.249,51.739)
  Int1 (GND) w0.2: RPI_PICO.10@101.6,55.395 102.474,55.214 102.524,55.164 103.299,55.164 103.449,55.089 106.899,51.639 107.949,51.639
GP8: RP2040.11 RPI_PICO.11 | length 12.1
  Top Layer w0.15: RP2040.11@107.063,48.595 107.574,48.589 107.5,48.589 RP2040.11@107.063,48.595
  Top Layer w0.2: 107.574,48.589 107.649,48.589 v1(107.924,48.314)
  Bottom Layer w0.15: RPI_PICO.11@100.762,52.855 102.339,52.549 ; RPI_PICO.11@101.6,52.855 102.339,52.549 ; 102.424,52.514 102.339,52.549 ; v1@107.799,48.439 v1(107.924,48.314)
  Bottom Layer w0.2: RPI_PICO.11@101.6,52.855 102.424,52.514 106.499,48.439 v1@107.799,48.439
GP9: RP2040.12 RPI_PICO.12 | length 9.3
  Top Layer w0.15: RPI_PICO.12@100.762,50.315 102.315,49.955 ; RPI_PICO.12@101.6,50.315 102.315,49.955 ; 102.399,49.914 102.315,49.955 ; 106.549,48.214 106.625,48.214 107.063,48.195 106.549,48.214
  Top Layer w0.2: RPI_PICO.12@101.6,50.315 102.399,49.914 103.899,48.414 106.249,48.414 106.449,48.214 106.549,48.214
GP10: RP2040.13 RPI_PICO.14 | length 9.5
  Top Layer w0.15: RPI_PICO.14@100.762,45.235 RPI_PICO.14@102.36,45.485 ; RPI_PICO.14@101.6,45.235 RPI_PICO.14@102.36,45.485 ; 102.449,45.514 RPI_PICO.14@102.36,45.485 ; 106.549,47.814 107.063,47.795 106.625,47.814 106.549,47.814
  Top Layer w0.2: RPI_PICO.14@101.6,45.235 102.449,45.514 104.749,47.814 106.549,47.814
GP11: RP2040.14 RPI_PICO.15 | length 10.3
  Top Layer w0.15: RPI_PICO.15@100.762,42.695 RPI_PICO.15@102.278,43.12 ; RPI_PICO.15@101.6,42.695 RPI_PICO.15@102.278,43.12 ; 102.349,43.164 RPI_PICO.15@102.278,43.12 ; 106.549,47.314 106.628,47.329 RP2040.14@107.063,47.395
  Top Layer w0.2: RPI_PICO.15@101.6,42.695 102.349,43.164 102.399,43.164 106.549,47.314 RP2040.14@107.063,47.395
GP12: RP2040.15 RPI_PICO.16 | length 12
  Top Layer w0.15: RPI_PICO.16@100.762,40.155 RPI_PICO.16@102.225,40.654 ; RPI_PICO.16@101.6,40.155 RPI_PICO.16@102.225,40.654 ; 102.299,40.714 RPI_PICO.16@102.225,40.654 ; 107.749,46.114 107.804,46.15 RP2040.15@107.9,46.557
  Top Layer w0.2: RPI_PICO.16@101.6,40.155 102.299,40.714 102.349,40.714 107.749,46.114 RP2040.15@107.9,46.557
GP13: RP2040.16 RPI_PICO.17 | length 14.4
  Top Layer w0.15: RPI_PICO.17@100.762,37.615 RPI_PICO.17@101.958,38.33 ; RPI_PICO.17@101.6,37.615 RPI_PICO.17@101.958,38.33 ; 101.999,38.414 RPI_PICO.17@101.958,38.33 ; 108.299,46.064 108.3,46.557 108.299,46.12 108.299,46.064
  Top Layer w0.2: RPI_PICO.17@101.6,37.615 101.999,38.414 102.749,39.164 102.749,40.414 108.299,45.964 108.299,46.064
GP14: RP2040.17 RPI_PICO.19 | length 21.1
  Top Layer w0.15: v1(108.099,43.864) 108.324,44.064 ; 108.699,46.064 108.7,46.557 108.699,46.12 108.699,46.064
  Top Layer w0.2: 108.324,44.064 108.624,44.364 108.749,44.514 108.749,45.914 108.699,45.964 108.699,46.064
  Bottom Layer w0.15: RPI_PICO.19@100.762,32.535 RPI_PICO.19@101.871,33.288 ; RPI_PICO.19@101.6,32.535 RPI_PICO.19@101.871,33.288 ; 101.899,33.364 RPI_PICO.19@101.871,33.288
  Bottom Layer w0.2: RPI_PICO.19@100.762,32.535 101.899,33.364 ; RPI_PICO.19@101.6,32.535 101.899,33.364 ; v1(108.099,43.864) 102.749,38.514 102.749,34.214 101.899,33.364